# Altium PCB IoT_SYNTHPATCH_ANALOG.PcbDoc (part 1 of 2)
Units mm, origin at the board's own origin, x right, y up, seen from the top; angles counter-clockwise.
Board outline 109 x 54 mm, 4 copper layers (Top Layer, PWR, GND, Bottom Layer), stack 1.587 mm thick; 165 components, 141 nets, 542 pads, 344 vias.
Unrouted connection lines stored in the file: 4.
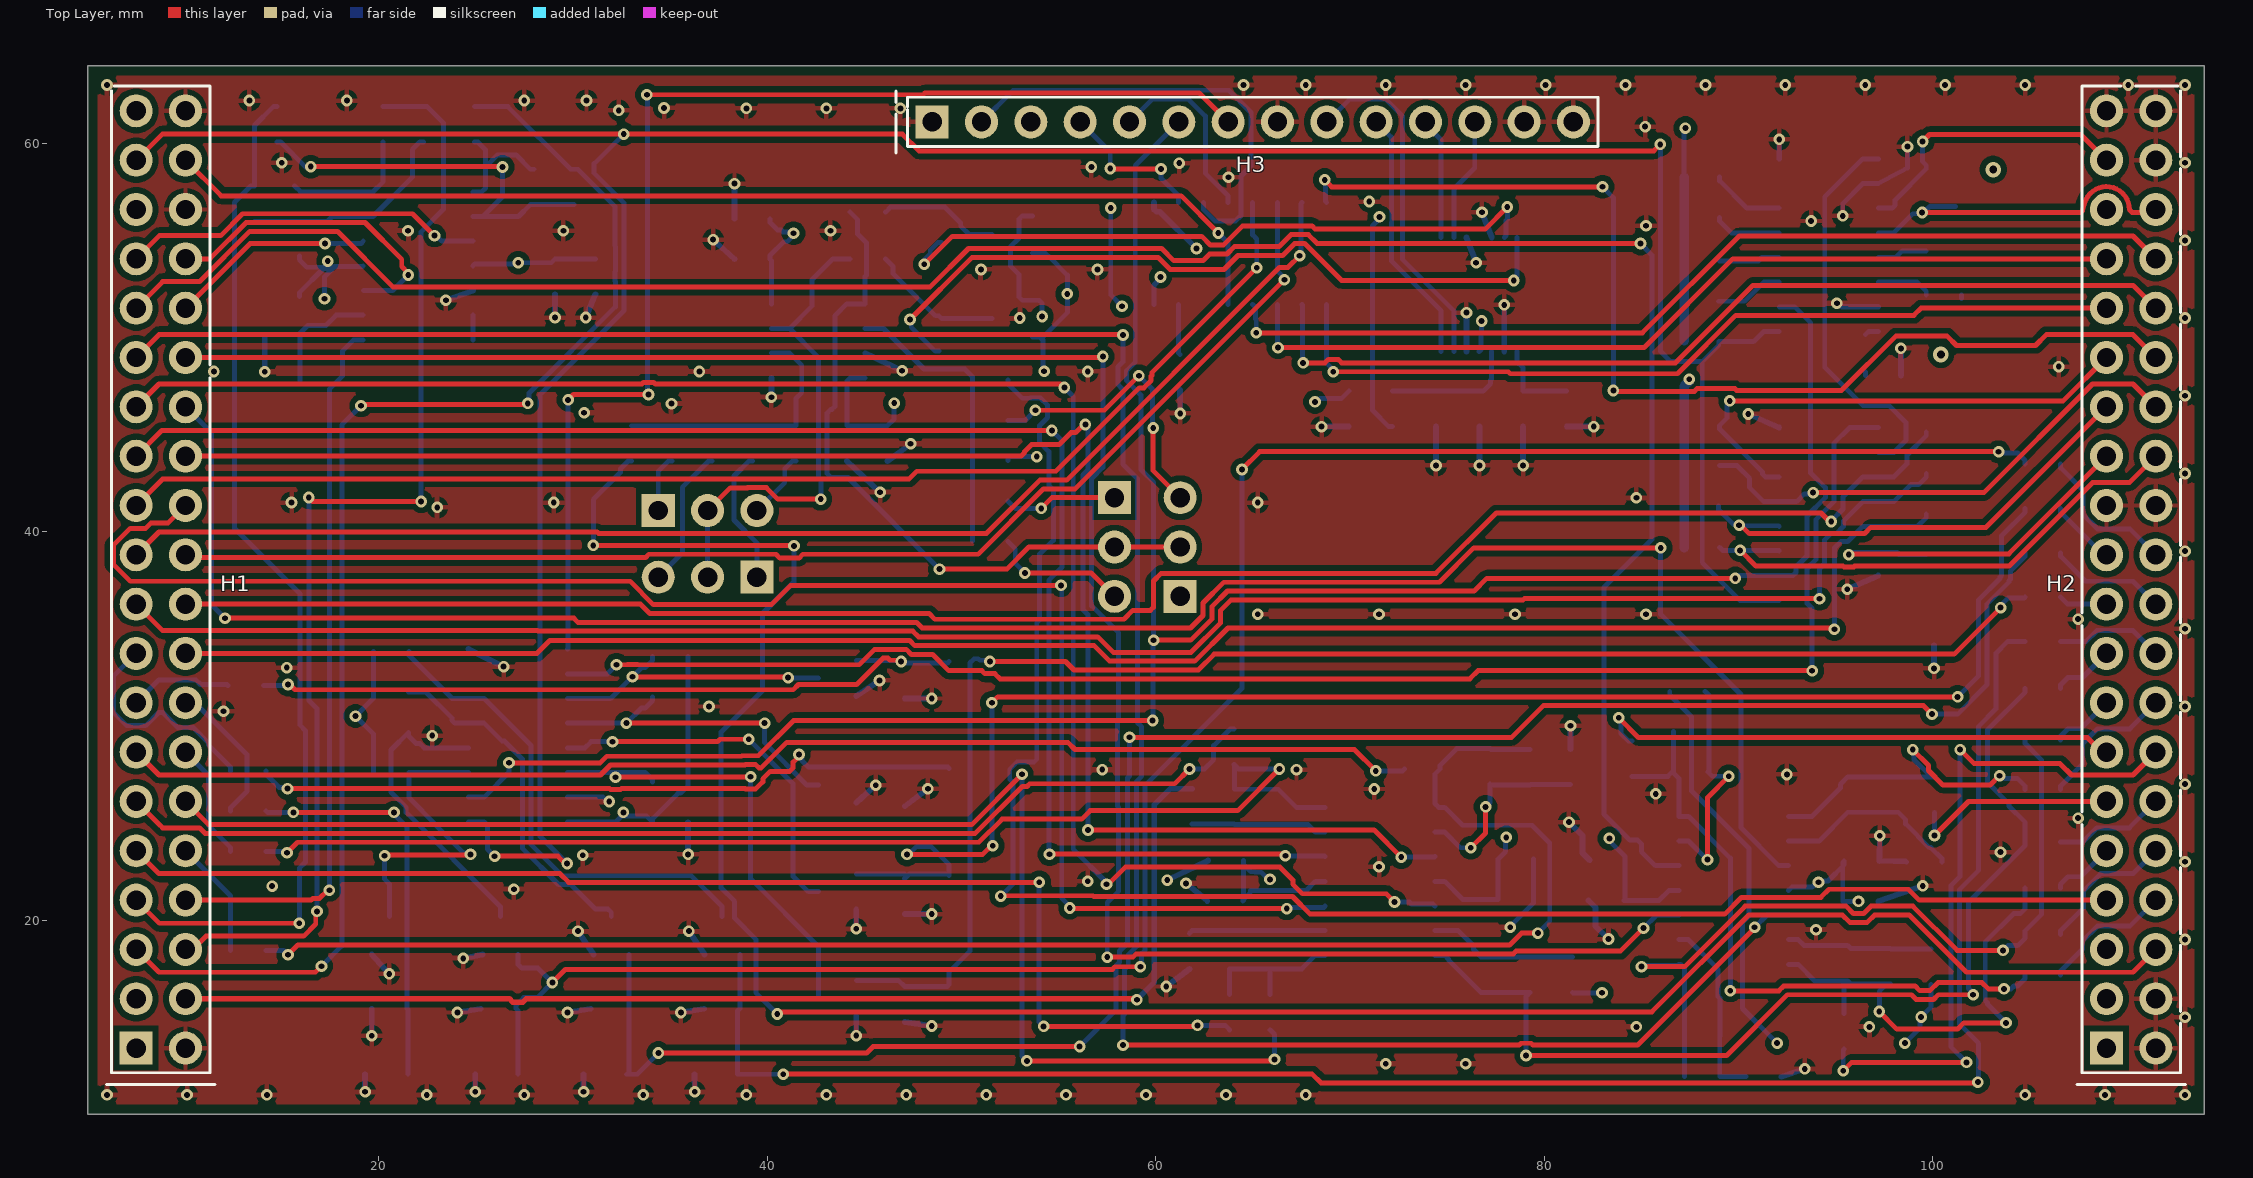
[diagram p0: Top Layer view]
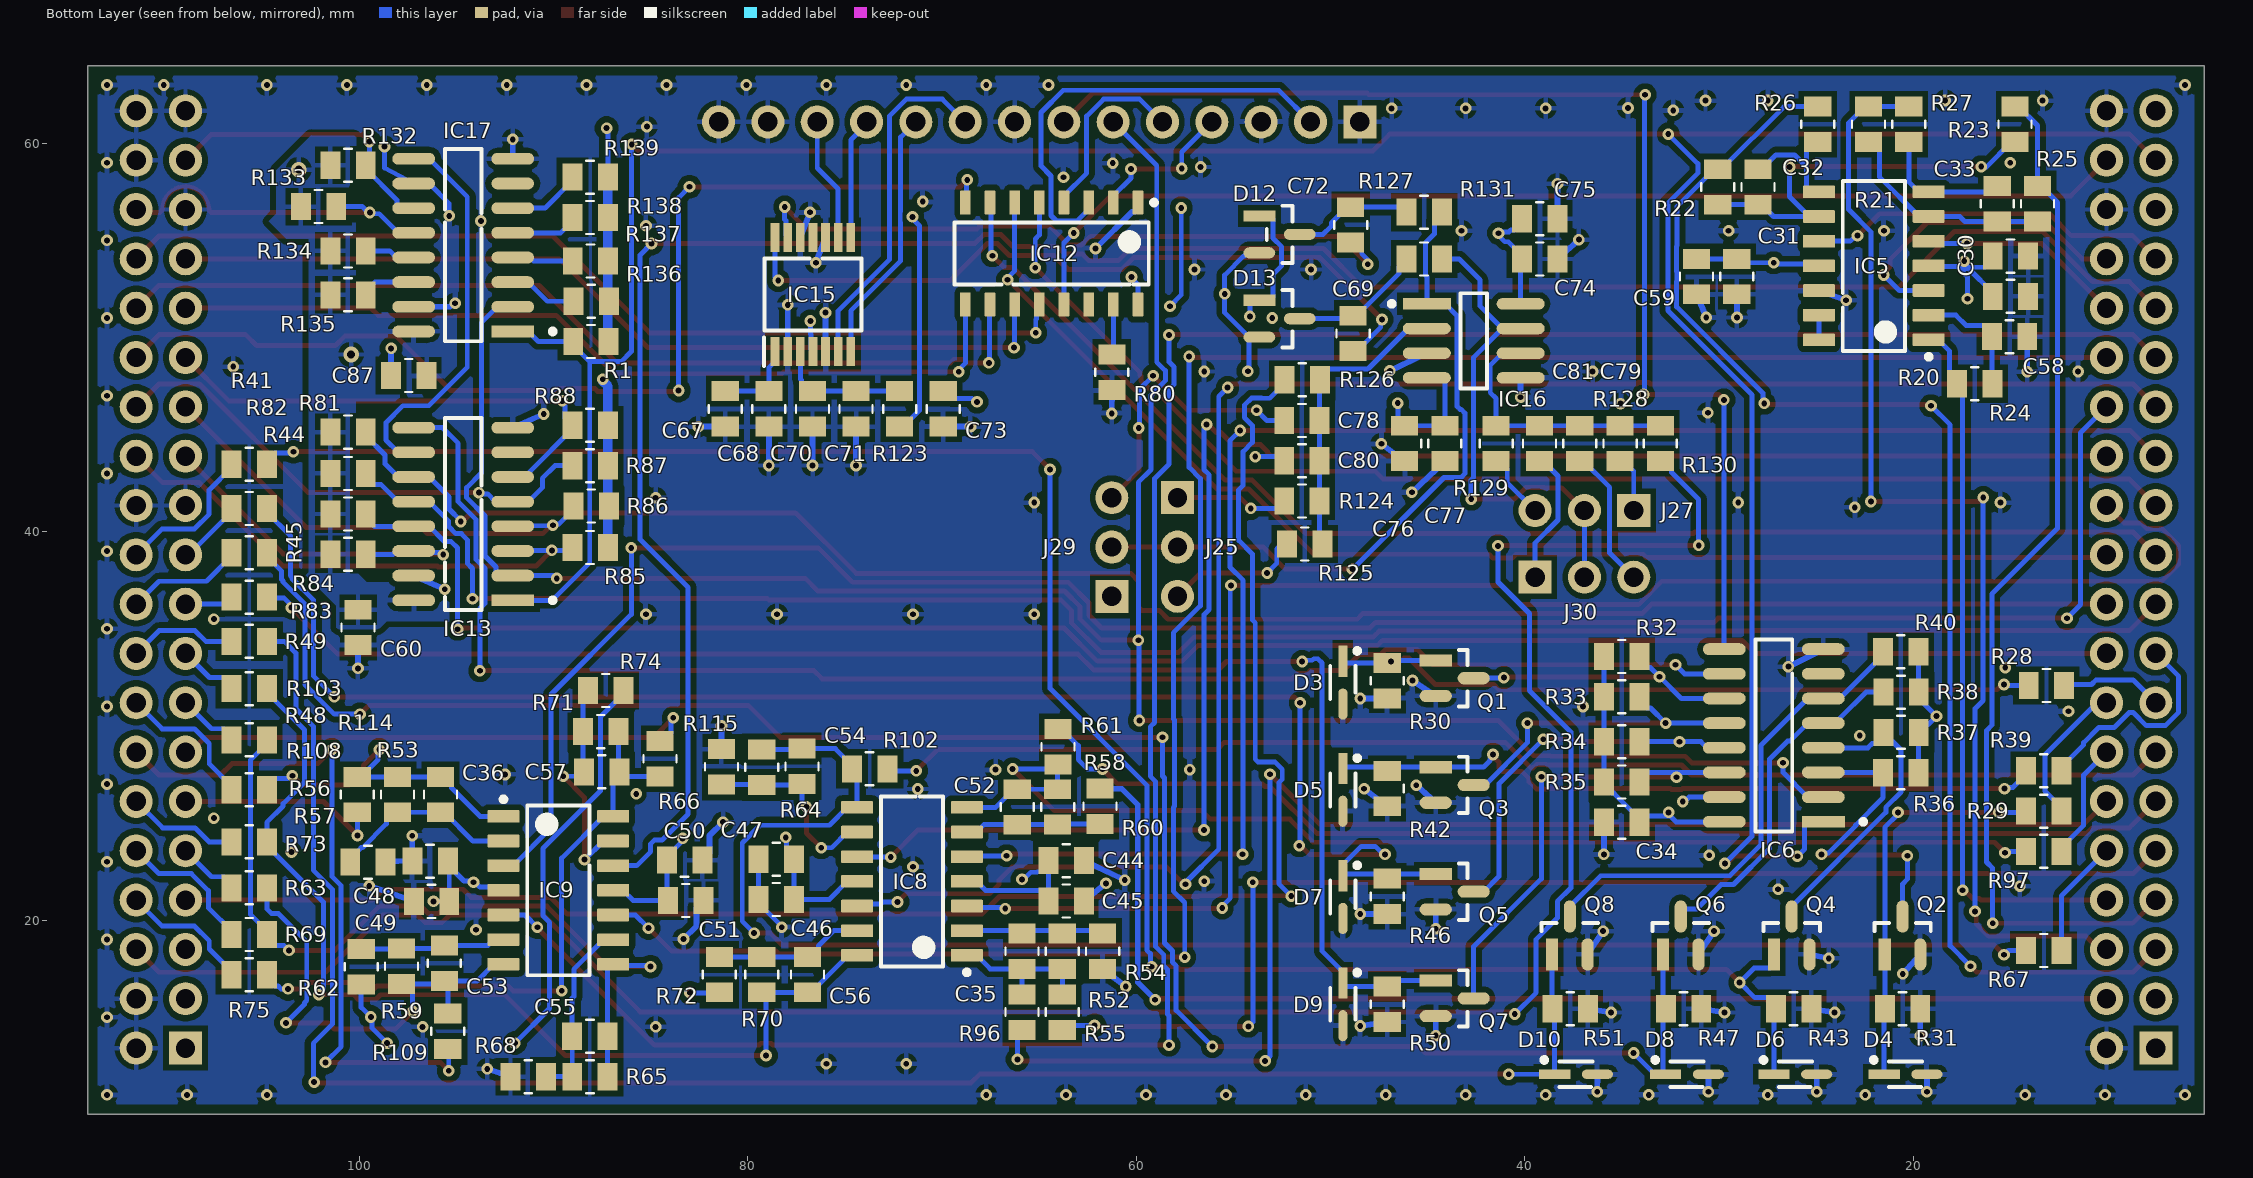
[diagram p1: Bottom Layer view, seen from below]
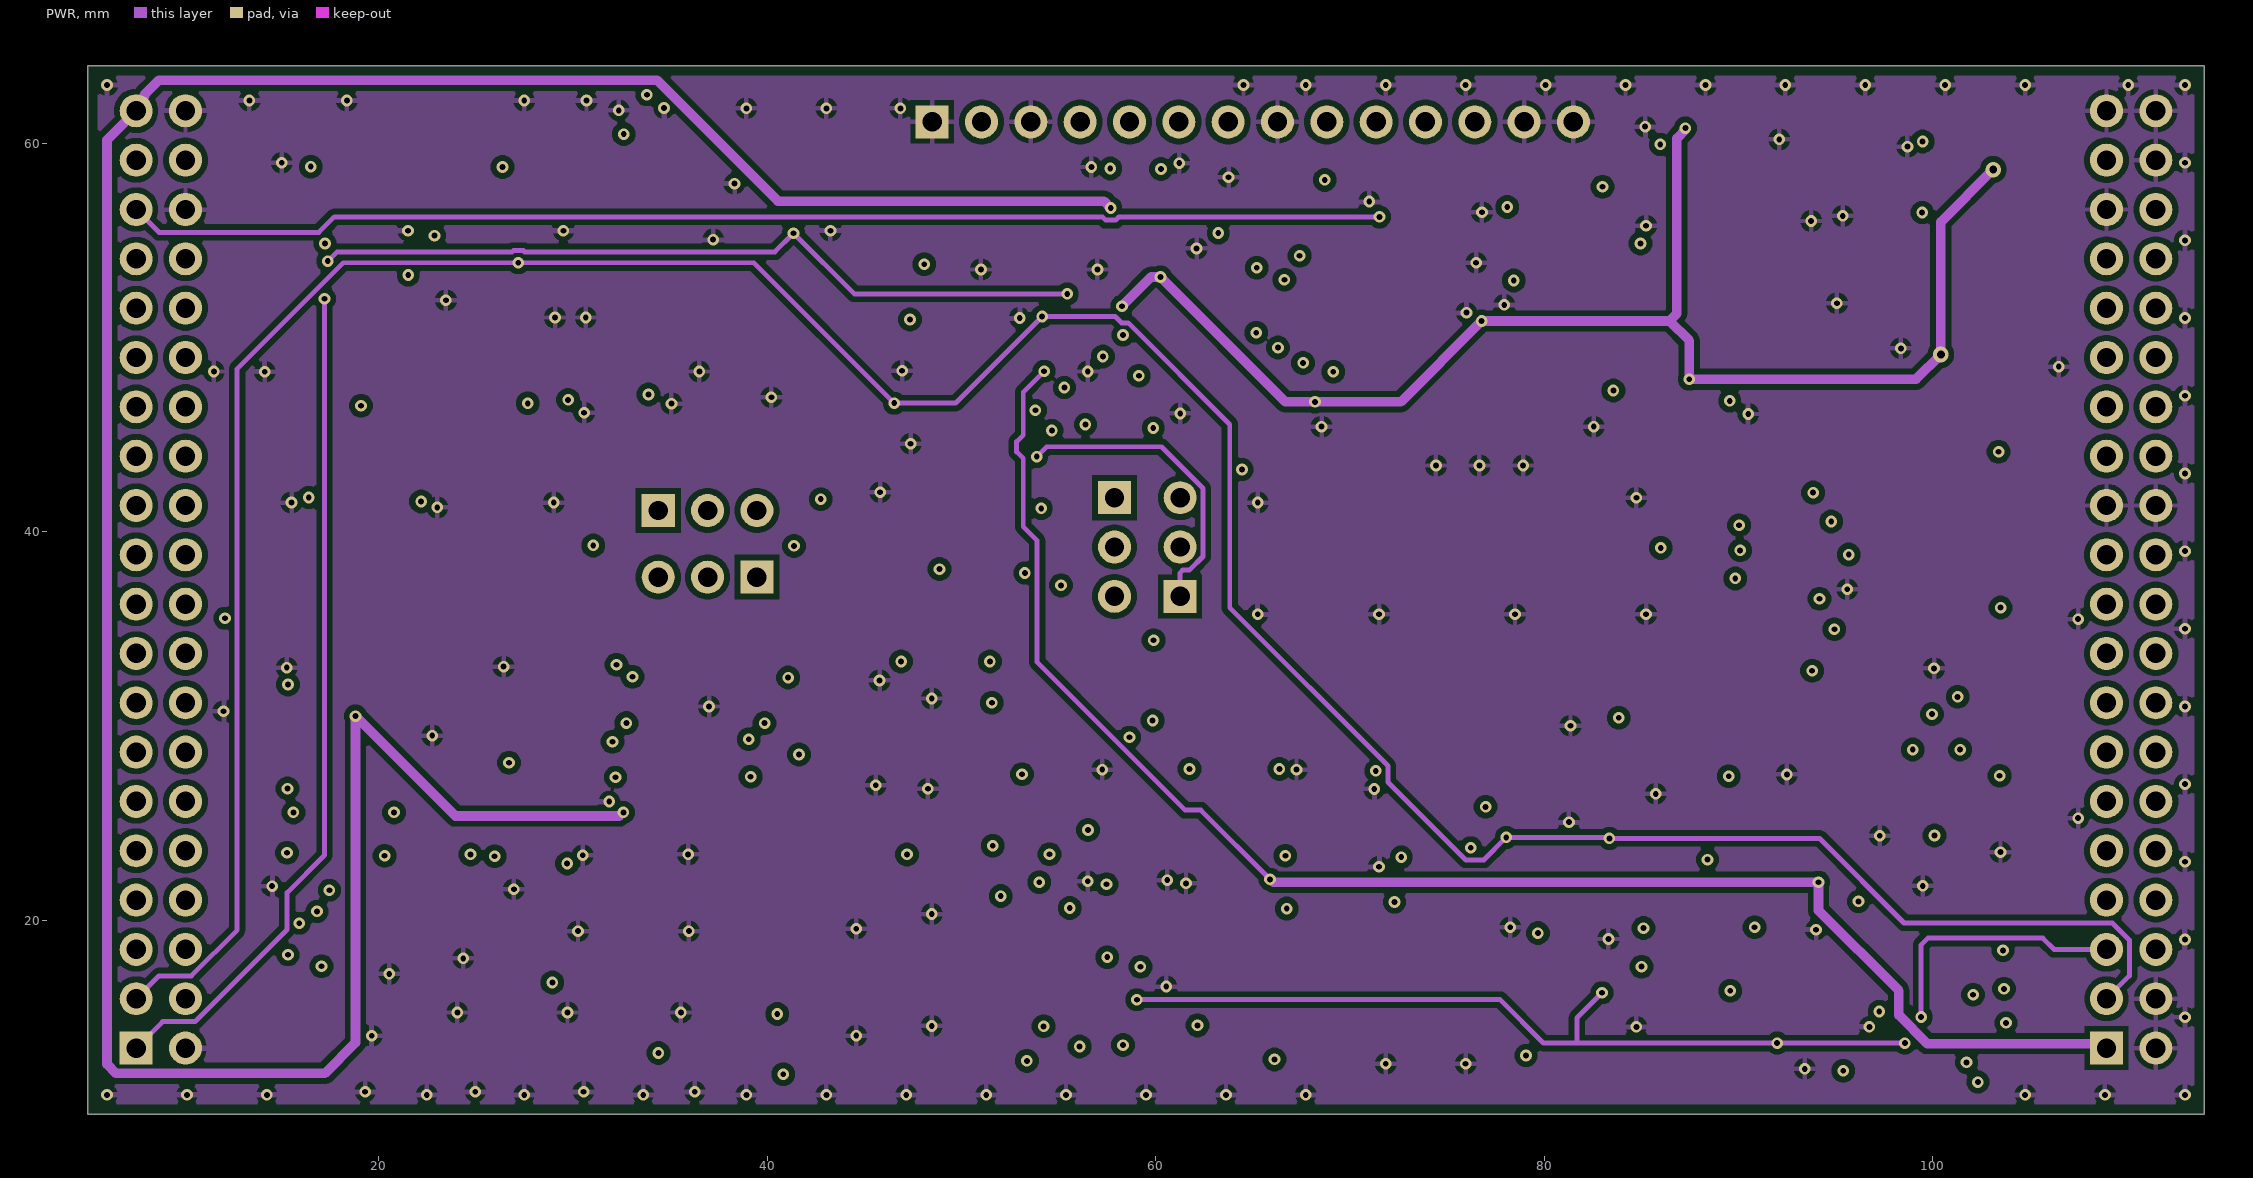
[diagram p2: PWR]
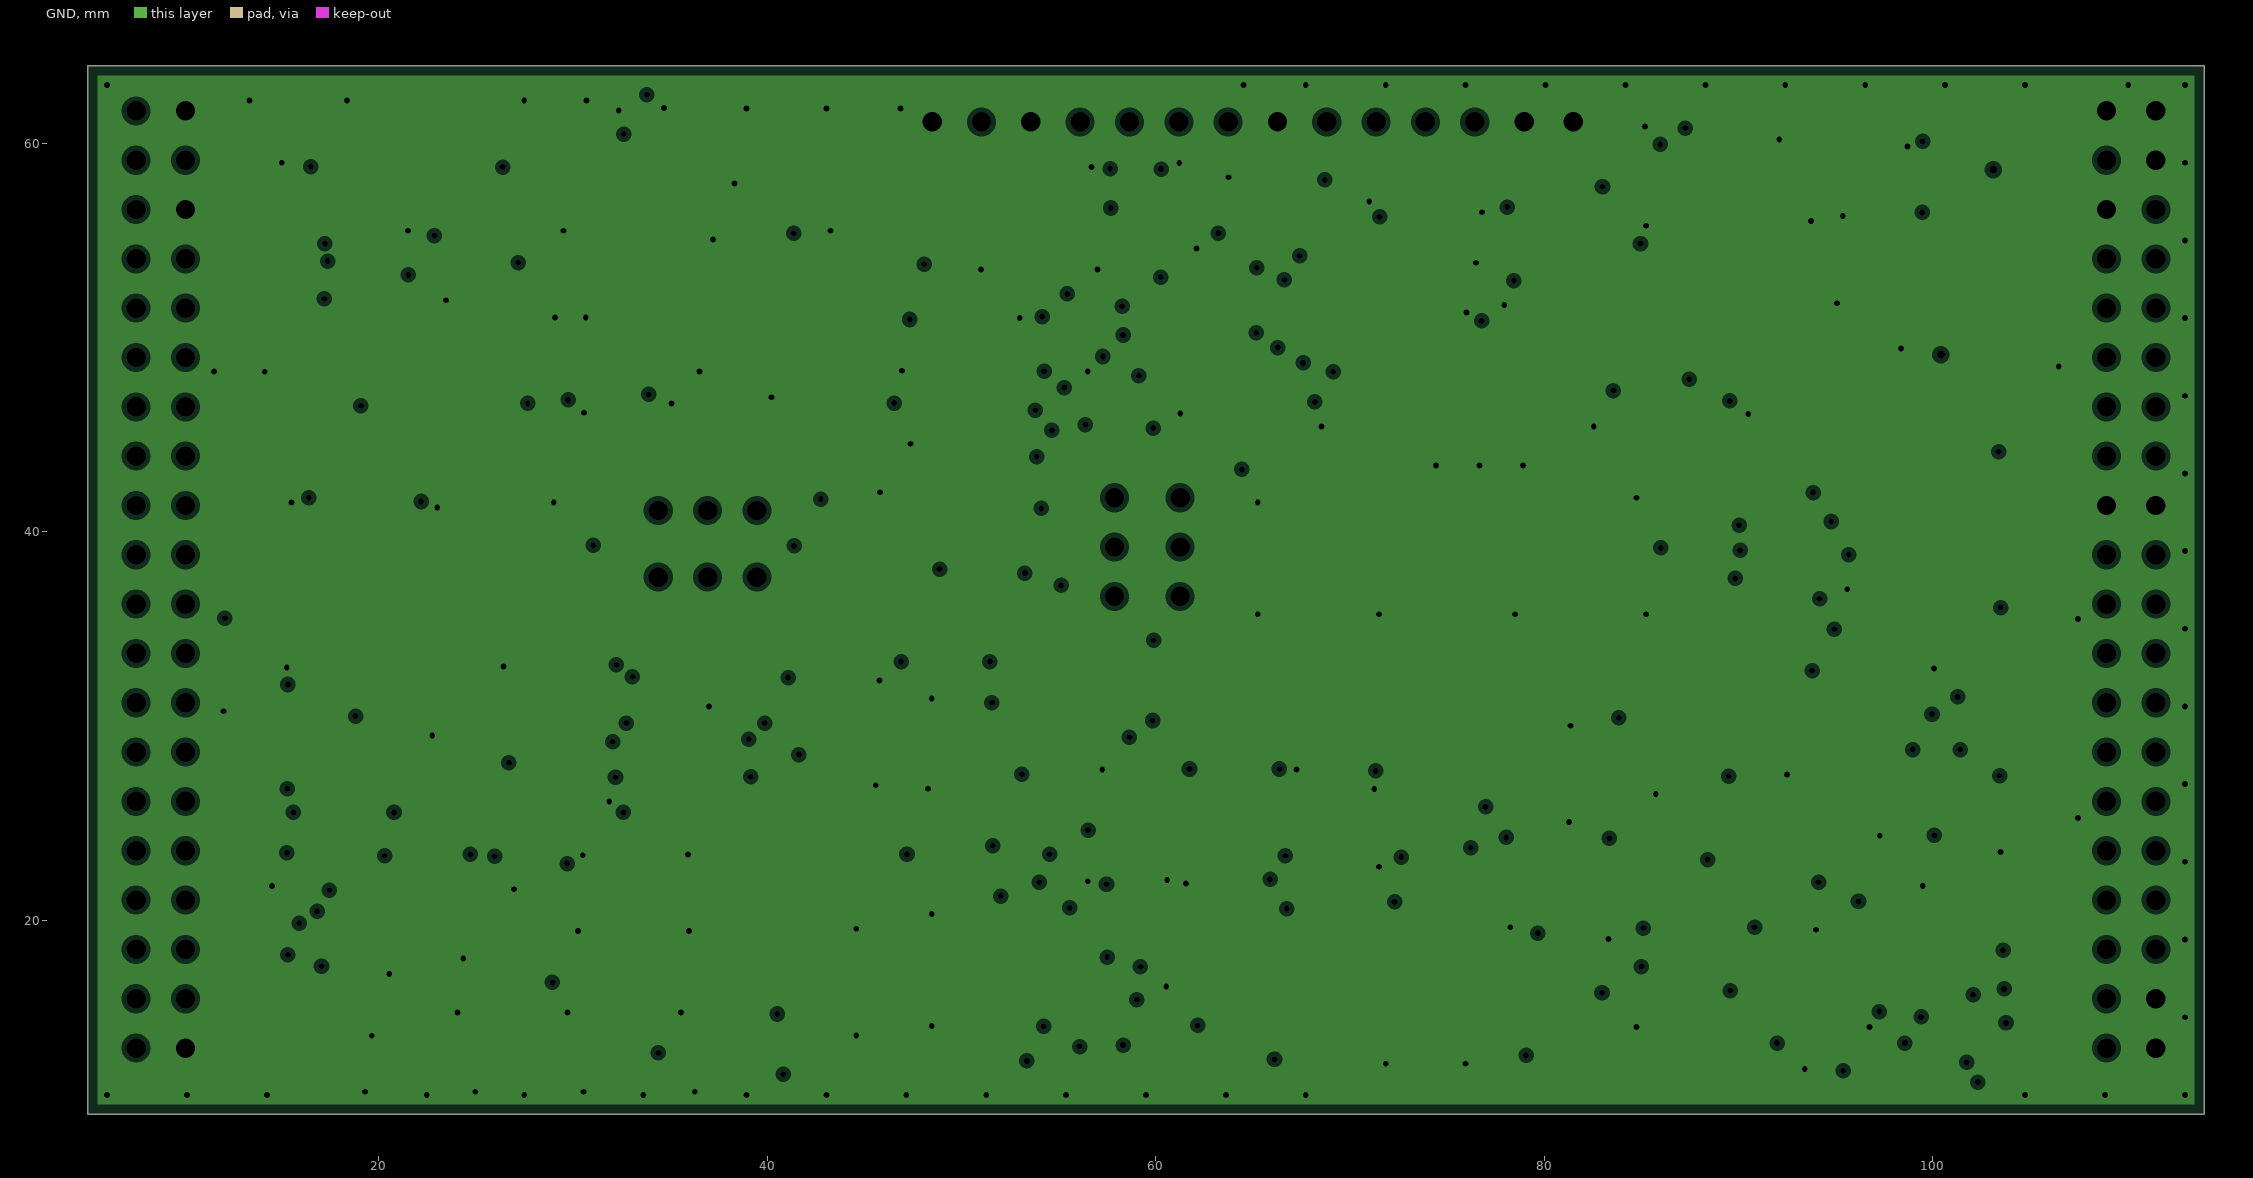
[diagram p3: GND, clearances drawn from the general rule]

## Layer stack, top to bottom
Top Solder: solder mask 0.0102, Solder Resist, Dk 3.5
Top Layer: signal copper 0.0356
Dielectric 2: prepreg 0.2104, PP-006, Dk 4.4
PWR: signal copper 0.0152
Dielectric 1: dielectric 1.065, FR-4, Dk 4.6
GND: plane copper 0.0152, net GND
Dielectric 3: prepreg 0.2104, PP-006, Dk 4.4
Bottom Layer: signal copper 0.0356
Bottom Solder: solder mask 0.0102, Solder Resist, Dk 3.5

## Board outline
5,10 5,64 114,64 114,10

## Design rules (kind name [scope] priority, off if disabled: settings)
BoardOutlineClearance [All] p1: gap=0.5 ignorepadtopadclearanceinfootprint=FALSE
Clearance Clearance_Polygon [InPolygon] p1: gap=0.3 ignorepadtopadclearanceinfootprint=FALSE
Clearance [All] p2: gap=0.2 ignorepadtopadclearanceinfootprint=FALSE
DiffPairsRouting [All] p1: maxlimit=0.2 minlimit=0.16 mostfreqgap=0.18 toplayer_minwidth=0.28 toplayer_maxwidth=0.32 toplayer_prefwidth=0.3 midlayer1_minwidth=0.28 midlayer1_maxwidth=0.32 midlayer1_prefwidth=0.3 bottomlayer_minwidth=0.28 bottomlayer_maxwidth=0.32 bottomlayer_prefwidth=0.3 maxuncoupledlength=12.7
HoleToHoleClearance [All] p1: gap=0.5 allowstackedmicrovias=TRUE
MinimumSolderMaskSliver [All] p1: minsoldermaskwidth=0.1
PlaneClearance [All] p1: clearance=0.25
PlaneConnect PlaneConnect_Vias [IsVia] p1: planeconnectstyle=Direct reliefexpansion=0.508 reliefentries=4 reliefconductorwidth=0.254 reliefairgap=0.254 // Stitching vias direct to plane
PlaneConnect [All] p2: planeconnectstyle=Relief reliefexpansion=0.508 reliefentries=4 reliefconductorwidth=0.254 reliefairgap=0.254
PolygonConnect [All] p1: connectstyle=Relief reliefconductorwidth=0.254 reliefentries=4 polygonreliefangle="90 Angle" airgapwidth=0.254
RoutingVias [All] p1: holewidth=0.3 width=0.6 viastyle="Through Hole" minholewidth=0.3 minwidth=0.6 maxholewidth=0.711 maxwidth=1.27
SilkToSolderMaskClearance [IsPad] p1: minsilkscreentomaskgap=0.15 clearancetoexposedcopper=TRUE
SolderMaskExpansion [All] p1: expansion=0 istentingtop=FALSE
SupplyNets "Schematic Supply Nets_5" [InNet('+3.3')] p1: voltage=0.000
SupplyNets "Schematic Supply Nets_4" [InNet('GND')] p2: voltage=0.000
SupplyNets "Schematic Supply Nets_3" [InNet('+5')] p3: voltage=0.000
SupplyNets "Schematic Supply Nets_2" [InNet('-12')] p4: voltage=0.000
SupplyNets "Schematic Supply Nets_1" [InNet('VREF_5')] p5: voltage=0.000
SupplyNets "Schematic Supply Nets" [InNet('+12')] p6: voltage=0.000
Width Width_PWR_LV [InNetClass('PWR_LV')] p1: maxlimit=2 minlimit=0.3 preferedwidth=0.5
Width Width_PWR_IN [InNetClass('PWR_IN')] p2: maxlimit=2 minlimit=0.4 preferedwidth=0.8
Width [All] p3: maxlimit=2 minlimit=0.15 preferedwidth=0.254
24 further rules are at their usual default settings.

## Classes and differential pairs
component class ADC_A: C67 C68 C69 C70 C71 C72 C73 D12 D13 IC15 R123
component class MUTE_BUTTONS_A: C60 IC12 IC13 R1 R80 R81 R82 R83 R84 R85 R86 R87 R88
component class MENU_BUTTONS_A: C87 IC17 R132 R133 R134 R135 R136 R137 R138 R139
component class INPUTS_GATES_A: C34 D3 D4 D5 D6 D7 D8 D9 D10 IC6 Q1 Q2 Q3 Q4 Q5 Q6 Q7 Q8 R28 R29 R30 R31 R32 R33 R34 R35 R36 R37 R38 R39 R40 R41 R42 R43 R44 R45 R46 R47 R48 R49 R50 R51
component class CONNECTORS: H1 H2 H3
component class VOCT_AMPS: C30 C31 C32 C33 C58 C59 IC5 R20 R21 R22 R23 R24 R25 R26 R27
component class LFO_AMPS: C35 C36 C44 C45 C46 C47 C48 C49 C50 C51 C52 C53 C54 C55 C56 C57 IC8 IC9 R52 R53 R54 R55 R56 R57 R58 R59 R60 R61 R62 R63 R64 R65 R66 R67 R68 R69 R70 R71 R72 R73 R74 R75 R96 R97 R102 R103 R108 R109 R114 R115
component class ADC_AMPS: C74 C75 C76 C77 C78 C79 C80 C81 IC16 J25 J27 J29 J30 R124 R125 R126 R127 R128 R129 R130 R131

## Components (designator, comment, footprint, x,y, rotation, side; value= is the part's Value field where it differs from the comment)
C30 "0.1uF" CAPC2013X145X48NL20T23 14.987,54.192 r0 bottom
C31 "0.1uF" CAPC2013X145X48NL20T23 29.075,53.138 r90 bottom
C32 "100pF" CAPC2013X145X48NL20T23 27.983,57.75 r270 bottom
C33 "100pF" CAPC2013X145X48NL20T23 15.664,56.888 r270 bottom
C34 "0.1uF" CAPC2013X145X48NL20T23 35.009,25.038 r0 bottom
C35 "100pF" CAPC2013X145X48NL20T23 65.884,18.398 r90 bottom
C36 "100pF" CAPC2013X145X48NL20T23 95.832,26.464 r270 bottom
C44 "10uF" CAPC2013X145X48NL20T23 63.599,23.061 r180 bottom
C45 "0.1uF" CAPC2013X145X48NL20T23 63.602,20.987 r180 bottom
C46 "0.1uF" CAPC2013X145X48NL20T23 78.537,21.063 r0 bottom
C47 "10uF" CAPC2013X145X48NL20T23 78.537,23.137 r0 bottom
C48 "10uF" CAPC2013X145X48NL20T23 96.365,23.035 r0 bottom
C49 "0.1uF" CAPC2013X145X48NL20T23 96.29,20.961 r0 bottom
C50 "0.1uF" CAPC2013X145X48NL20T23 83.259,23.086 r180 bottom
C51 "10uF" CAPC2013X145X48NL20T23 83.197,21.012 r180 bottom
C52 "100pF" CAPC2013X145X48NL20T23 66.125,25.824 r270 bottom
C53 "100pF" CAPC2013X145X48NL20T23 95.629,17.778 r90 bottom
C54 "100pF" CAPC2013X145X48NL20T23 77.214,27.913 r270 bottom
C55 "100pF" CAPC2013X145X48NL20T23 88.136,14.018 r0 bottom
C56 "100pF" CAPC2013X145X48NL20T23 76.934,17.195 r90 bottom
C57 "100pF" CAPC2013X145X48NL20T23 87.518,27.633 r0 bottom
C58 "10uF" CAPC2013X145X48NL20T23 14.987,52.118 r0 bottom
C59 "10uF" CAPC2013X145X48NL20T23 31.149,53.138 r90 bottom
C60 "0.1uF" CAPC2013X145X48NL20T23 100.075,35.068 r270 bottom
C67 "0.1uF" CAPC2013X145X48NL20T23 81.162,46.322 r90 bottom
C68 "10uF" CAPC2013X145X48NL20T23 78.918,46.322 r90 bottom
C69 "1uF" CAPC2013X145X48NL20T23 48.837,50.208 r270 bottom
C70 "0.1uF" CAPC2013X145X48NL20T23 76.675,46.322 r90 bottom
C71 "10uF" CAPC2013X145X48NL20T23 74.431,46.322 r90 bottom
C72 "1uF" CAPC2013X145X48NL20T23 48.964,55.796 r270 bottom
C73 "0.1uF" CAPC2013X145X48NL20T23 69.944,46.322 r90 bottom
C74 "0.1uF" CAPC2013X145X48NL20T23 39.224,54.041 r180 bottom
C75 "10uF" CAPC2013X145X48NL20T23 39.224,56.115 r180 bottom
C76 "0.1uF" CAPC2013X145X48NL20T23 46.184,44.544 r270 bottom
C77 "10uF" CAPC2013X145X48NL20T23 44.11,44.544 r270 bottom
C78 "270pF" CAPC2013X145X48NL20T23 51.471,45.729 r0 bottom
C79 "270pF" CAPC2013X145X48NL20T23 37.161,44.544 r270 bottom
C80 "68pF" CAPC2013X145X48NL20T23 51.471,43.655 r0 bottom
C81 "68pF" CAPC2013X145X48NL20T23 39.235,44.544 r270 bottom
C87 "0.1uF" CAPC2013X145X48NL20T23 97.457,48.041 r0 bottom
D3 "1N4148WS" 4148 49.363,32.226 r270 bottom
D4 "1N4148WS" 4148 20.389,12.061 r180 bottom
D5 "1N4148WS" 4148 49.363,26.705 r270 bottom
D6 "1N4148WS" 4148 26.064,12.061 r180 bottom
D7 "1N4148WS" 4148 49.363,21.184 r270 bottom
D8 "1N4148WS" 4148 31.641,12.061 r180 bottom
D9 "1N4148WS" 4148 49.363,15.664 r270 bottom
D10 "1N4148WS" 4148 37.356,12.061 r180 bottom
D12 "BAT54S-E3-08" FP-6_541-5014_01-4-IPC_A 52.622,55.311 r180 bottom value=10pF
D13 "BAT54S-E3-08" FP-6_541-5014_01-4-IPC_A 52.622,50.967 r180 bottom value=10pF
H1 "Pin header 2x20 2.54 mm" HDR_2x20_P2.54 8.77,37.54 r90 top
H2 "Pin header 2x20 2.54 mm" HDR_2x20_P2.54 110.23,37.54 r90 top
H3 "Pin header 1x14 2.54 mm" HDR_1X14_P2.54 65,61.087 r0 top
IC5 "TL074CDRG4" TL074 22.02,53.688 r0 bottom
IC6 "74HC165D,653" FP-SOT109-1-MFG 27.17,29.507 r0 bottom
IC8 "TL074CDRG4" TL074 71.55,21.994 r0 bottom
IC9 "TL074CDRG4" TL074 89.761,21.534 r180 bottom
IC12 "TLC5916QDRQ1" D0016A_N 64.356,54.323 r270 bottom
IC13 "74HC165D,653" FP-SOT109-1-MFG 94.658,40.912 r0 bottom
IC15 "PCM1808PW" SOP65P640X120-14N 76.65,52.215 r90 bottom
IC16 "TL072ACDRE4" TL072 42.624,49.827 r180 bottom
IC17 "74HC165D,653" FP-SOT109-1-MFG 94.658,54.755 r0 bottom
J25 "Pinheader_1x3" HDR_1X3_P2.54 57.879,41.75 r270 bottom
J27 "Pinheader_1x3" HDR_1X3_P2.54 34.384,41.09 r0 bottom
J29 "Pinheader_1x3" HDR_1X3_P2.54 61.257,36.67 r90 bottom
J30 "Pinheader_1x3" HDR_1X3_P2.54 39.464,37.661 r180 bottom
Q1 "MMBT3904-7-F" 3904-SOT23 43.604,32.454 r180 bottom
Q2 "MMBT3904-7-F" 3904-SOT23 20.542,19.206 r90 bottom
Q3 "MMBT3904-7-F" 3904-SOT23 43.604,26.959 r180 bottom
Q4 "MMBT3904-7-F" 3904-SOT23 26.253,19.206 r90 bottom
Q5 "MMBT3904-7-F" 3904-SOT23 43.604,21.464 r180 bottom
Q6 "MMBT3904-7-F" 3904-SOT23 31.963,19.206 r90 bottom
Q7 "MMBT3904-7-F" 3904-SOT23 43.604,15.969 r180 bottom
Q8 "MMBT3904-7-F" 3904-SOT23 37.674,19.206 r90 bottom
R1 "10K" FP-RN73R2A-IPC_A 88.08,49.794 r180 bottom
R20 "20K" FP-RN73R2A-IPC_A 15.032,50.044 r0 bottom
R21 "20K" FP-RN73R2A-IPC_A 22.294,60.978 r270 bottom
R22 "20K" FP-RN73R2A-IPC_A 30.057,57.75 r270 bottom
R23 "20K" FP-RN73R2A-IPC_A 14.75,60.978 r270 bottom
R24 "20K" FP-RN73R2A-IPC_A 16.819,47.622 r180 bottom
R25 "20K" FP-RN73R2A-IPC_A 13.59,56.888 r90 bottom
R26 "1K" FP-RN73R2A-IPC_A 24.91,60.978 r270 bottom
R27 "1K" FP-RN73R2A-IPC_A 20.22,60.978 r270 bottom
R28 "10K" FP-RN73R2A-IPC_A 13.132,32.08 r0 bottom
R29 "10K" FP-RN73R2A-IPC_A 13.279,25.612 r0 bottom
R30 "100K" FP-RN73R2A-IPC_A 47.074,32.327 r90 bottom
R31 "100K" FP-RN73R2A-IPC_A 20.542,15.436 r0 bottom
R32 "10K" FP-RN73R2A-IPC_A 35.009,33.571 r180 bottom
R33 "10K" FP-RN73R2A-IPC_A 35.009,31.497 r180 bottom
R34 "10K" FP-RN73R2A-IPC_A 35.009,29.186 r180 bottom
R35 "10K" FP-RN73R2A-IPC_A 35.009,27.112 r180 bottom
R36 "10K" FP-RN73R2A-IPC_A 20.638,27.591 r0 bottom
R37 "10K" FP-RN73R2A-IPC_A 20.621,29.665 r0 bottom
R38 "10K" FP-RN73R2A-IPC_A 20.621,31.739 r0 bottom
R39 "10K" FP-RN73R2A-IPC_A 13.279,27.686 r0 bottom
R40 "10K" FP-RN73R2A-IPC_A 20.638,33.82 r0 bottom
R41 "10K" FP-RN73R2A-IPC_A 105.684,43.477 r180 bottom
R42 "100K" FP-RN73R2A-IPC_A 47.074,26.773 r90 bottom
R43 "100K" FP-RN73R2A-IPC_A 26.153,15.436 r0 bottom
R44 "10K" FP-RN73R2A-IPC_A 105.684,41.196 r180 bottom
R45 "10K" FP-RN73R2A-IPC_A 105.684,38.914 r180 bottom
R46 "100K" FP-RN73R2A-IPC_A 47.074,21.22 r90 bottom
R47 "100K" FP-RN73R2A-IPC_A 31.819,15.436 r0 bottom
R48 "10K" FP-RN73R2A-IPC_A 105.684,36.632 r180 bottom
R49 "10K" FP-RN73R2A-IPC_A 105.682,34.351 r180 bottom
R50 "100K" FP-RN73R2A-IPC_A 47.074,15.666 r90 bottom
R51 "100K" FP-RN73R2A-IPC_A 37.661,15.436 r0 bottom
R52 "20K" FP-RN73R2A-IPC_A 63.81,18.398 r270 bottom
R53 "20K" FP-RN73R2A-IPC_A 98.042,26.464 r90 bottom
R54 "20K" FP-RN73R2A-IPC_A 61.736,18.398 r90 bottom
R55 "1K" FP-RN73R2A-IPC_A 63.81,15.263 r270 bottom
R56 "20K" FP-RN73R2A-IPC_A 99.566,22.985 r0 bottom
R57 "1K" FP-RN73R2A-IPC_A 100.116,26.464 r270 bottom
R58 "20K" FP-RN73R2A-IPC_A 64.051,25.826 r90 bottom
R59 "20K" FP-RN73R2A-IPC_A 97.839,17.625 r270 bottom
R60 "20K" FP-RN73R2A-IPC_A 61.872,25.855 r270 bottom
R61 "1K" FP-RN73R2A-IPC_A 64.03,28.93 r90 bottom
R62 "20K" FP-RN73R2A-IPC_A 99.913,17.6 r90 bottom
R63 "1K" FP-RN73R2A-IPC_A 105.682,21.659 r0 bottom
R64 "20K" FP-RN73R2A-IPC_A 79.288,27.876 r90 bottom
R65 "20K" FP-RN73R2A-IPC_A 88.134,11.936 r180 bottom
R66 "20K" FP-RN73R2A-IPC_A 81.362,27.896 r270 bottom
R67 "1K" FP-RN73R2A-IPC_A 13.279,18.433 r180 bottom
R68 "20K" FP-RN73R2A-IPC_A 91.311,11.936 r180 bottom
R69 "1K" FP-RN73R2A-IPC_A 105.682,19.255 r0 bottom
R70 "20K" FP-RN73R2A-IPC_A 79.288,17.195 r270 bottom
R71 "20K" FP-RN73R2A-IPC_A 87.572,29.707 r180 bottom
R72 "20K" FP-RN73R2A-IPC_A 81.468,17.195 r90 bottom
R73 "1K" FP-RN73R2A-IPC_A 105.682,24.026 r0 bottom
R74 "20K" FP-RN73R2A-IPC_A 87.323,31.826 r0 bottom
R75 "1K" FP-RN73R2A-IPC_A 105.682,17.181 r0 bottom
R80 "2K" FP-RN73R2A-IPC_A 61.257,48.204 r90 bottom
R81 "10K" FP-RN73R2A-IPC_A 100.59,45.129 r180 bottom
R82 "10K" FP-RN73R2A-IPC_A 100.59,42.999 r180 bottom
R83 "10K" FP-RN73R2A-IPC_A 100.59,40.912 r180 bottom
R84 "10K" FP-RN73R2A-IPC_A 100.59,38.837 r180 bottom
R85 "10K" FP-RN73R2A-IPC_A 88.126,39.186 r0 bottom
R86 "10K" FP-RN73R2A-IPC_A 88.072,41.324 r0 bottom
R87 "10K" FP-RN73R2A-IPC_A 88.126,43.398 r0 bottom
R88 "10K" FP-RN73R2A-IPC_A 88.126,45.479 r0 bottom
R96 "100K" FP-RN73R2A-IPC_A 65.884,15.263 r90 bottom
R97 "100K" FP-RN73R2A-IPC_A 13.279,23.538 r0 bottom
R102 "100K" FP-RN73R2A-IPC_A 73.734,27.785 r0 bottom
R103 "100K" FP-RN73R2A-IPC_A 105.682,31.92 r180 bottom
R108 "100K" FP-RN73R2A-IPC_A 105.682,26.713 r180 bottom
R109 "100K" FP-RN73R2A-IPC_A 95.451,14.272 r90 bottom
R114 "100K" FP-RN73R2A-IPC_A 105.682,29.279 r180 bottom
R115 "100K" FP-RN73R2A-IPC_A 84.524,28.313 r270 bottom
R123 "10R" FP-RN73R2A-IPC_A 72.188,46.322 r270 bottom
R124 "27K" FP-RN73R2A-IPC_A 51.471,41.581 r0 bottom
R125 "100K" FP-RN73R2A-IPC_A 51.332,39.37 r0 bottom
R126 "100K" FP-RN73R2A-IPC_A 51.459,47.828 r180 bottom
R127 "470" FP-RN73R2A-IPC_A 45.181,56.457 r0 bottom
R128 "27K" FP-RN73R2A-IPC_A 35.087,44.544 r270 bottom
R129 "100K" FP-RN73R2A-IPC_A 41.471,44.544 r270 bottom
R130 "100K" FP-RN73R2A-IPC_A 33.013,44.544 r90 bottom
R131 "470" FP-RN73R2A-IPC_A 45.181,54.041 r0 bottom
R132 "10K" FP-RN73R2A-IPC_A 100.59,58.869 r180 bottom
R133 "10K" FP-RN73R2A-IPC_A 102.108,56.744 r180 bottom
R134 "10K" FP-RN73R2A-IPC_A 100.59,54.458 r180 bottom
R135 "10K" FP-RN73R2A-IPC_A 100.59,52.193 r180 bottom
R136 "10K" FP-RN73R2A-IPC_A 88.072,51.868 r0 bottom
R137 "10K" FP-RN73R2A-IPC_A 88.107,53.942 r0 bottom
R138 "10K" FP-RN73R2A-IPC_A 88.126,56.177 r0 bottom
R139 "10K" FP-RN73R2A-IPC_A 88.126,58.257 r0 bottom

## Footprints (in the part's own frame and the unit in brackets; to place one, negate y for a bottom-side part, rotate by r counter-clockwise, add the part's x,y. Pads: shape width x height; smd on the part's side, far side on the other; paste and mask are expansions set on the pad)
3904-SOT23 [mm]
  rect 1.659x0.627 smd paste+0 mask+0: 1(-0.977,0.915)
  rrect100% 1.659x0.627 smd paste+0 mask+0: 2(-0.977,-0.915) 3(0.977,0)
  silkscreen extent 0.23,-1.45 0.65,1.45, body extent -1.2,-1.45 1.2,1.45, height 1.1
4148 [mm]
  rect 1.606x0.472 smd paste+0 mask+0: 1(-1.1,0)
  rrect100% 1.606x0.472 smd paste+0 mask+0: 2(1.1,0)
  silkscreen extent -1.76,-0.65 0.85,0.86, body extent -1.25,-0.63 1.25,0.63, height 0.9
CAPC2013X145X48NL20T23 [mm] "0805 (2012 metric)"
  rect 1.025x1.4 smd paste+0 mask+0: 1(-0.913,0) 2(0.913,0)
  silkscreen extent -0.19,-0.85 0.19,0.85
D0016A_N [mm] "SOIC, 16-Leads, Body 10x4mm, Pitch 1.27mm, IPC High Density"
  rrect18% 1.25x0.55 smd: 1(-2.625,4.445) 2(-2.625,3.175) 3(-2.625,1.905) 4(-2.625,0.635) 5(-2.625,-0.635) 6(-2.625,-1.905) 7(-2.625,-3.175) 8(-2.625,-4.445) 9(2.625,-4.445) 10(2.625,-3.175) 11(2.625,-1.905) 12(2.625,-0.635) 13(2.625,0.635) 14(2.625,1.905) 15(2.625,3.175) 16(2.625,4.445)
  silkscreen extent -2.75,-5 1.6,5.39, body extent -3,-4.95 3,4.95, height 1.59
FP-6_541-5014_01-4-IPC_A [mm]
  rect 1.633x0.572 smd paste+0 mask+0: 1(-1.038,0.95)
  rrect100% 1.633x0.572 smd paste+0 mask+0: 2(-1.038,-0.95) 3(1.038,0)
  silkscreen extent -0.66,-1.47 0.66,1.48, body extent -1.24,-1.48 1.24,1.48, height 1.15
FP-RN73R2A-IPC_A [mm] "0805 (2012 metric)"
  rect 1.025x1.4 smd paste+0 mask+0: 1(-0.913,0) 2(0.912,0)
  silkscreen extent -0.19,-0.85 0.19,0.85
FP-SOT109-1-MFG [mil]
  rect 86.79x23.94 smd paste+0 mask+0: 1(-100.43,175)
  rrect100% 86.79x23.94 smd paste+0 mask+0: 2(-100.43,125) 3(-100.43,75) 4(-100.43,25) 5(-100.43,-25) 6(-100.43,-75) 7(-100.43,-125) 8(-100.43,-175) 9(100.43,-175) 10(100.43,-125) 11(100.43,-75) 12(100.43,-25) 13(100.43,25) 14(100.43,75) 15(100.43,125) 16(100.43,175)
  silkscreen extent -186,-195 37,195, body extent -118,-195 118,195, height 69
HDR_1X3_P2.54 [mm] "Pin header 1x3, 2.54 mm"
  rect 1.7x1.7 hole 1: 1(0,0)
  round 1.7 hole 1: 2(2.54,0) 3(5.08,0)
HDR_1X14_P2.54 [mm] "Single-row header 1x14, 2.54 mm pitch (board-to-board)"
  rect 1.7x1.7 hole 1: 1(-16.51,0.013)
  round 1.7 hole 1: 2(-13.97,0.013) 3(-11.43,0.013) 4(-8.89,0.013) 5(-6.35,0.013) 6(-3.81,0.013) 7(-1.27,0.013) 8(1.27,0.013) 9(3.81,0.013) 10(6.35,0.013) 11(8.89,0.013) 12(11.43,0.013) 13(13.97,0.013) 14(16.51,0.013)
  silkscreen extent -18.38,-1.59 17.78,1.61
HDR_2x20_P2.54 [mm] "Pin header 2x20, 2.54 mm (analog board, top)"
  rect 1.7x1.7 hole 1: 1(-24.13,1.27)
  round 1.7 hole 1: 2(-24.13,-1.27) 3(-21.59,1.27) 4(-21.59,-1.27) 5(-19.05,1.27) 6(-19.05,-1.27) 7(-16.51,1.27) 8(-16.51,-1.27) 9(-13.97,1.27) 10(-13.97,-1.27) 11(-11.43,1.27) 12(-11.43,-1.27) 13(-8.89,1.27) 14(-8.89,-1.27) 15(-6.35,1.27) 16(-6.35,-1.27) 17(-3.81,1.27) 18(-3.81,-1.27) 19(-1.27,1.27) 20(-1.27,-1.27) 21(1.27,1.27) 22(1.27,-1.27) 23(3.81,1.27) 24(3.81,-1.27) 25(6.35,1.27) 26(6.35,-1.27) 27(8.89,1.27) 28(8.89,-1.27) 29(11.43,1.27) 30(11.43,-1.27) 31(13.97,1.27) 32(13.97,-1.27) 33(16.51,1.27) 34(16.51,-1.27) 35(19.05,1.27) 36(19.05,-1.27) 37(21.59,1.27) 38(21.59,-1.27) 39(24.13,1.27) 40(24.13,-1.27)
  silkscreen extent -26,-2.8 25.4,2.8
SOP65P640X120-14N [mm]
  rect 1.475x0.45 smd: 1(-2.938,1.95) 2(-2.938,1.3) 3(-2.938,0.65) 4(-2.938,0) 5(-2.938,-0.65) 6(-2.938,-1.3) 7(-2.938,-1.95) 8(2.938,-1.95) 9(2.938,-1.3) 10(2.938,-0.65) 11(2.938,0) 12(2.938,0.65) 13(2.938,1.3) 14(2.938,1.95)
  silkscreen extent -3.67,-2.5 1.85,2.52
TL072 [mil]
  rect 97.4x23.31 smd paste+0 mask+0: 1(-95.12,75)
  rrect100% 97.4x23.31 smd paste+0 mask+0: 2(-95.12,25) 3(-95.12,-25) 4(-95.12,-75) 5(95.12,-75) 6(95.12,-25) 7(95.12,25) 8(95.12,75)
  silkscreen extent -171,-96 27,96, body extent -118,-96 118,96, height 69
TL074 [mm] "SOIC, 14-Leads, Body 8.75x4mm, Pitch 1.27mm, IPC Low Density"
  rrect15% 1.65x0.65 smd: 1(-2.825,3.81) 2(-2.825,2.54) 3(-2.825,1.27) 4(-2.825,0) 5(-2.825,-1.27) 6(-2.825,-2.54) 7(-2.825,-3.81) 8(2.825,-3.81) 9(2.825,-2.54) 10(2.825,-1.27) 11(2.825,0) 12(2.825,1.27) 13(2.825,2.54) 14(2.825,3.81)
  silkscreen extent -2.95,-4.37 1.6,4.81, body extent -3.02,-4.32 3.02,4.32, height 1.59

## Part data
C30 C31 C32 C33 C34 C35 C36 C44 C45 C46 C47 C48 C49 C50 C51 C52 C53 C54 C55 C56 C57 C58 C59 C60 C67 C68 C69 C70 C71 C72 C73 C74 C75 C76 C77 C78 C79 C80 C81 C87: library part CAP, Manufacturer=Vitramon, Part Number=VJ0805Y682KXAMT
D3 D4 D5 D6 D7 D8 D9 D10: library part 4148WS, "DIODE GEN PURP 75V 150MA SOD323F", Average Rectified Current=150mA, Forward Voltage=1V, Max Forward Surge Current (Ifsm)=2A, Max Operating Temperature=150°C, Max Repetitive Reverse Voltage (Vrrm)=75V, Min Operating Temperature=-55°C, Package Quantity=1, Peak Reverse Current=5uA, Power Dissipation=200mW, Contact Plating=Tin, Element Configuration=Single, Forward Current=150mA, Height=1mm, Lead Free="Lead Free", Length=1.8mm, Max Reverse Voltage (DC)=75V, Mount="Surface Mount", Number of Pins=2, Packaging="Tape and Reel", Radiation Hardening=No, REACH SVHC="No SVHC", Recovery Time=4ns, Reverse Recovery Time=4ns, Reverse Voltage=75V, Weight=0.0276g, Width=1.35mm
D12 D13: library part BAT54S, "DIODE ARRAY SCHOTTKY 30V SOT23", Capacitance=10pF, Forward Current=200mA, Manufacturer=Vishay, Max Junction Temp=+125°C, Max Repetitive Reverse Voltage=30V, Max Surge Forward Current=600mA, Package=6.541-5014.01-4, Peak Reverse Current=2uA, Temperature="-55°C to +125°C", Temperature Range Low=-55°C, Automotive=No, Category=Diode, ComponentLink2Description=Datasheet, ComponentLink2URL=http://www.vishay.com/docs/85508/bat54.pdf, Device Class L1="Discrete Semiconductors", Device Class L2=Diodes, Device Class L3="Schottky Diodes", Digikey Description="DIODE ARRAY SCHOTTKY 30V SOT23", Height=1.15mm, Lead Free=Yes, Manufacturer Part Number=BAT54S-E3-08, Mouser Description="Schottky Diodes & Rectifiers 200mA 30 Volt", Octopart=https://octopart.com/bat54s-e3-08-vishay-29186616, RoHS=TRUE, Temperature Range High=+125°C
IC5 IC8 IC9: library part tl074, "Quad Low-Noise JFET-Input General-Purpose Operational Amplifier, 7 to 36 V, 0 to 70 degC, 14-pin SOIC (D14), Green (RoHS & no Sb/Br)", Manufacturer="Texas Instruments", Rating=Military, Total Supply Voltage(Max)(+5V is 5, +/-5V is 10)=36, Total Supply Voltage(Min)(+5V is 5, +/-5V is 10)=7, CMRR(Min)(dB)=70, Code_JEDEC=MS-012, ComponentLink1Description="Manufacturer URL", ComponentLink1URL=http://www.ti.com/, ComponentLink2Description=Datasheet, ComponentLink2URL=http://www.ti.com/lit/ds/symlink/tl074.pdf, ComponentLink3Description="Package Specification", ComponentLink3URL=http://www.ti.com/lit/ml/mpds177g/mpds177g.pdf, DatasheetVersion=SLOS080J, Eco-Plan="Green (RoHS & no Sb/Br)", GBW(Typ)(MHz)=3, IIB(Max)(pA)=200, Iq per channel(Max)(mA)=2.5, Mounting Technology="Surface Mount", Number of Channels=4, Offset Drift(Typ)(uV/C)=18, PackageDescription="14-Pin Plastic Small Outline, Body 8.65 x 3.90 mm, Pitch 1.27 mm", PackageReference=D0014A, PackageVersion="4040047-5/M, 06/2011", PartNumber=TL074CDRG4, Slew Rate(Typ)(V/us)=13, Sub Family="General Purpose Amplifier, High Supply Voltage Amplifier (>=30V)", Vio (25C)(Max)(mV)=10, Vn at 1kHz(Typ)(nV/rtHz)=18
IC6 IC13 IC17: library part 74HC165, "IC SHIFT REGST 8BIT PI-SO 16SOIC", Ambient Temperature Range High=+125°C, Ambient Temperature Range Low=-40°C, Frequency=61MHz, Manufacturer=Nexperia, Max Supply Voltage=6V, Min Supply Voltage=2V, Nominal Supply Current=8uA, Package=SOT109-1, Temperature="-40°C to +125°C", Automotive=No, Category=IC, ComponentLink2Description=Datasheet, ComponentLink2URL=https://assets.nexperia.com/documents/data-sheet/74HC_HCT165.pdf, Device Class L1="Integrated Circuits (ICs)", Device Class L2="Logic ICs", Device Class L3="Shift Registers", Digikey Description="IC SHIFT REGST 8BIT PI-SO 16SOIC", Footprint Url=https://assets.nexperia.com/documents/outline-drawing/SOT109-1.pdf, Height=1.75mm, Ipc Land Pattern Name=SOP127P600X175-16, Lead Free=Yes, Logic Function Desc="Shift Register", Manufacturer Part Number=74HC165D,653, Number Of Circuits=1, Number Of Inputs=8, Number Of Outputs=1, Octopart=https://octopart.com/74hc165d%2C653-nexperia-78737091, Propagation Delay=15ns, RoHS=TRUE, Standoff Height=0.1mm, Temperature Range High=+125°C, Temperature Range Low=-40°C
IC12: library part TLC5916, "Automotive Catalog 8-Bit Constant-Current LED Sink Drivers, 3 to 5.5 V, -40 to 125 degC, 16-pin SOIC (D16), Green (RoHS & no Sb/Br)", Manufacturer="Texas Instruments", Code_JEDEC=MS-012, ComponentLink1Description="Manufacturer URL", ComponentLink1URL=http://www.ti.com/, ComponentLink2Description=Datasheet, ComponentLink2URL=http://www.ti.com/general/docs/lit/getliterature.tsp?genericPartNumber=TLC5916-Q1&fileType=pdf, ComponentLink3Description="Package Specification", ComponentLink3URL=http://www.ti.com/litv/pdf/mpds178g, DatasheetVersion=SLVS814, Eco-Plan="Green (RoHS & no Sb/Br)", Iout(Max)(A)=0.12, Mounting Technology="Surface Mount", PackageDescription="16-Pin Plastic Small Outline, Body 9.90 x 3.90 mm, Pitch 1.27 mm", PackageReference=D0016A, PackageVersion=4040047-6/M, PartNumber=TLC5916QDRQ1, SubFamily="LED Driver", Vin(Max)(V)=5.5, Vin(Min)(V)=3
IC15: "99dB SNR Stereo ADC With Single-Ended Inputs", Manufacturer_Name="Texas Instruments", Mouser Part Number=595-PCM1808PW, Datasheet Link=http://www.ti.com/lit/gpn/pcm1808, Geometry.Height=1.2mm, Manufacturer_Part_Number=PCM1808PW, Mouser Price/Stock=https://www.mouser.co.uk/ProductDetail/Texas-Instruments/PCM1808PW?qs=iSMark9AYDWYQaMpH%2FhwPg%3D%3D
IC16: library part tl072, "Low-Noise JFET-Input Operational Amplifier, 7 to 36 V, 0 to 70 degC, 8-pin SOIC (D8), Green (RoHS & no Sb/Br)", Manufacturer="Texas Instruments", Rating=Catalog, Total Supply Voltage(Max)(+5V is 5, +/-5V is 10)=36, Total Supply Voltage(Min)(+5V is 5, +/-5V is 10)=7, CMRR(Min)(dB)=75, Code_JEDEC=MS-012, ComponentLink1Description="Manufacturer URL", ComponentLink1URL=http://www.ti.com/, ComponentLink2Description=Datasheet, ComponentLink2URL=http://www.ti.com/lit/ds/symlink/tl072a.pdf, ComponentLink3Description="Package Specification", ComponentLink3URL=http://www.ti.com/litv/pdf/msoi002j, DatasheetVersion=SLOS080J, Eco-Plan="Green (RoHS & no Sb/Br)", GBW(Typ)(MHz)=3, IIB(Max)(pA)=200, Iq per channel(Max)(mA)=2.5, Mounting Technology="Surface Mount", Number of Channels=2, Offset Drift(Typ)(uV/C)=18, PackageDescription="8-Pin Plastic Small Outline, Body 4.9 x 3.9 mm, Pitch 1.27 mm", PackageReference=D8, PackageVersion="4040047-3/M, 06/2011", PartNumber=TL072ACDRE4, Slew Rate(Typ)(V/us)=13, Sub Family="General Purpose Amplifier, High Supply Voltage Amplifier (>=30V)", Vio (25C)(Max)(mV)=6, Vn at 1kHz(Typ)(nV/rtHz)=18
Q1 Q2 Q3 Q4 Q5 Q6 Q7 Q8: library part 3904, "TRANS NPN 40V 0.2A SMD SOT23-3", Case/Package=SOT-23, Collector Base Voltage (VCBO)=60V, Collector Emitter Breakdown Voltage=40V, Collector Emitter Saturation Voltage=300mV, Continuous Collector Current=200mA, Emitter Base Voltage (VEBO)=6V, Frequency=300MHz, Max Operating Temperature=150°C, Max Power Dissipation=300mW, Min Operating Temperature=-55°C, Package Quantity=3000, Power Dissipation=350mW, Collector Emitter Voltage (VCEO)=40V, Contact Plating=Tin, Element Configuration=Single, Gain Bandwidth Product=300MHz, Height=1mm, hFE Min=100, Lead Free="Lead Free", Length=3.05mm, Max Breakdown Voltage=40V, Max Collector Current=200mA, Max Frequency=300MHz, Mount="Surface Mount", Number of Elements=1, Number of Pins=3, Packaging="Tape and Reel", Polarity=NPN, Radiation Hardening=No, REACH SVHC="No SVHC", Transition Frequency=300MHz, Voltage Rating (DC)=40V, Weight=0.000282oz, Width=1.4mm
R1 R20 R21 R22 R23 R24 R25 R26 R27 R28 R29 R30 R31 R32 R33 R34 R35 R36 R37 R38 R39 R40 R41 R42 R43 R44 R45 R46 R47 R48 R49 R50 R51 R52 R53 R54 R55 R56 R57 R58 R59 R60 R61 R62 R63 R64 R65 R66 R67 R68 R69 R70 R71 R72 R73 R74 R75 R80 R81 R82 R83 R84 R85 R86 R87 R88 R96 R97 R102 R103 R108 R109 R114 R115 R123 R124 R125 R126 R127 R128 R129 R130 R131 R132 R133 R134 R135 R136 R137 R138 R139: library part Resistor, "RES 10K OHM 0.1% 1/8W 0805"

## Via types
v1: diameter 0.6, hole 0.3, Top Layer to Bottom Layer, 342 vias
v2: diameter 0.8, hole 0.4, Top Layer to Bottom Layer, 2 vias

## Nets (pads, with @x,y where several pads share a name; then routed paths per layer and width w, separated by ;. In a path a pad name is that pad's centre, name@x,y a point inside that pad or via, vN(x,y) a via of type N, cw(c..) or ccw(c..) an arc to the next point about the centre after c; other vN are vias at no path point)
+3.3: C34.1 C60.1 C73.2 C87.1 H1.39 IC6.16 IC12.16 IC13.16 IC15.4 IC17.16 R1.2 R32.1 R33.1 R34.1 R35.1 R36.1 R37.1 R38.1 R40.1 R81.1 R82.1 R83.1 R84.1 R85.1 R86.1 R87.1 R88.1 R132.1 R133.1 R134.1 R135.1 R136.1 R137.1 R138.1 R139.1 | length 273.5
  PWR w0.254: v1@87.274,60.698 v1(87.274,60.782)
  PWR w0.5: v1(32.588,25.544) 32.561,25.544 32.372,25.355 23.947,25.355 v1(18.796,30.505) 18.796,13.691 17.215,12.11 6.464,12.11 5.994,12.579 5.994,60.164 H1.39@7.5,61.67 7.5,61.995 7.928,62.423 7.928,62.504 8.674,63.25 34.327,63.25 40.555,57.023 57.328,57.023 v1(57.683,56.667) ; v1(58.268,51.613) 59.766,53.111 v1(60.249,53.111) 66.675,46.685 v1(68.199,46.685) 72.619,46.685 v1(76.784,50.851) 86.462,50.851 ; v1@87.274,60.698 86.835,60.259 86.835,51.224 86.462,50.851 ; v2(103.126,58.649) 100.432,55.955 v2(100.432,49.124) 99.162,47.854 v1(87.478,47.854) 87.478,49.835 86.462,50.851
  Bottom Layer w0.254: R36.1@19.726,27.591 19.726,29.576 v1(18.796,30.505) 19.726,31.435 R40.1@19.726,33.82 ; IC6.16@29.721,25.062 32.208,25.062 32.495,25.349 v1@32.588,25.349 ; v1(32.588,25.544) v1@32.588,25.349 ; R32.1@35.922,33.571 R33.1@35.922,31.497 R34.1@35.922,29.186 R35.1@35.922,27.112 35.922,26.924 35.536,26.539 35.41,26.539 34.097,25.225 C34.1@34.097,25.038 33.785,25.349 v1@32.588,25.349 ; v1(57.683,56.667) 57.683,52.197 v1(58.268,51.613) ; IC12.16@59.911,51.698 59.911,52.704 60.249,53.042 v1(60.249,53.111) ; v1(68.199,46.685) 68.293,46.685 68.456,46.849 69.558,46.849 C73.2@69.944,47.235 ; IC15.4@76.65,49.277 76.748,49.375 76.748,50.15 76.784,50.186 v1(76.784,50.851) ; R1.2@87.168,49.794 R1.2@87.214,49.84 ; R139.1@87.214,58.257 87.214,60.721 v1(87.274,60.782) ; v1@87.478,47.76 v1(87.478,47.854) ; C87.1@96.545,48.041 C87.1@96.545,48.228 ; IC17.16@96.545,50.146 96.708,50.31 IC17.16@97.209,50.31 ; R135.1@101.503,52.005 R135.1@101.503,52.193
  Bottom Layer w0.5: R85.1@87.214,39.186 R87.1@87.214,43.398 R88.1@87.214,45.479 87.214,47.496 v1@87.478,47.76 ; R1.2@87.214,49.84 R138.1@87.214,56.177 R139.1@87.214,58.257
+5: H1.35 R123.2 | length 76.5
  PWR w0.254: H1.35@7.5,56.59 8.677,55.413 16.909,55.413 17.706,56.21 57.254,56.21 57.424,56.04 57.943,56.04 58.113,56.21 v1(71.526,56.21)
  Bottom Layer w0.254: v1(71.526,56.21) 71.526,56.117 71.161,55.751 71.161,46.249 72,45.41 R123.2@72.188,45.41
+12: C30.2 C44.1 C45.1 C48.1 C49.1 C58.2 C74.1 C75.1 D12.2 D13.2 H1.1 H2.1 IC5.4 IC8.4 IC9.4 IC16.8 | length 201.6
  PWR w0.254: H1.1@7.5,13.41 8.863,14.773 10.528,14.773 15.273,19.519 15.273,21.417 17.196,23.339 v1(17.196,51.994) ; v1(17.362,53.934) 17.369,53.934 17.847,54.412 26.855,54.412 26.918,54.475 27.438,54.475 27.501,54.412 40.391,54.412 v1(41.351,55.372) 44.479,52.244 v1(55.448,52.244) ; v1(54.254,48.26) 53.178,47.183 53.178,44.971 52.84,44.634 52.84,44.114 53.178,43.776 53.178,40.255 53.891,39.542 53.891,33.284 61.516,25.659 62.327,25.659 v1(65.888,22.098) ; H2.1@108.73,13.64 H2.1@108.96,13.41
  PWR w0.5: v1(65.888,22.098) 65.915,22.098 66.067,21.946 v1(94.132,21.946) 94.132,20.498 98.265,16.366 98.265,15.102 99.727,13.64 H2.1@108.73,13.64
  Bottom Layer w0.254: C58.2@15.9,52.118 15.9,52.305 17.145,53.551 17.613,53.551 ; C30.2@15.9,54.192 15.9,54.004 16.285,53.619 17.145,53.619 17.145,53.623 17.362,53.84 v1(17.362,53.934) ; v1(17.196,51.994) 17.196,53.133 17.613,53.551 ; IC5.4@19.195,53.688 19.159,53.652 17.715,53.652 17.613,53.551 ; C75.1@40.136,56.115 40.136,55.928 40.522,55.542 40.709,55.542 40.813,55.438 41.285,55.438 v1(41.351,55.372) 41.285,55.306 41.285,55.191 41.024,54.93 40.838,54.93 40.136,54.229 C74.1@40.136,54.041 40.208,53.97 IC16.8@40.208,51.732 ; D13.2@53.661,50.017 D13.2@54.041,50.017 ; D12.2@53.661,54.361 54.277,54.361 54.436,54.202 54.46,54.202 55.448,53.213 v1(55.448,52.244) 55.448,51.275 54.191,50.017 D13.2@54.041,50.017 ; v1(54.254,48.26) 54.188,48.326 54.188,49.87 D13.2@54.041,50.017 ; C44.1@64.512,23.061 C44.1@64.512,22.873 ; v1(65.888,22.098) 65.794,22.098 65.429,22.463 65.11,22.463 65.085,22.488 64.897,22.488 C44.1@64.512,22.873 ; IC8.4@68.725,21.994 68.225,21.994 67.756,21.525 64.868,21.525 64.868,21.412 64.482,21.027 64.482,20.987 64.512,21.017 C44.1@64.512,22.873 ; IC9.4@92.586,21.534 92.751,21.699 93.792,21.699 94.039,21.946 v1(94.132,21.946) 94.199,22.012 94.616,22.012 95.452,22.848 C48.1@95.452,23.036 95.378,22.961 C49.1@95.378,20.962 v1(96.19,20.962)
-12: C31.2 C46.1 C47.1 C50.1 C51.1 C59.2 C76.1 C77.1 D12.1 D13.1 H1.3 H2.3 IC5.11 IC8.11 IC9.11 IC16.4 | length 197.8
  PWR w0.254: H1.3@7.5,15.95 8.677,17.127 10.342,17.127 12.7,19.485 12.7,48.385 18.163,53.848 39.304,53.848 v1(46.533,46.619) 49.692,46.619 v1(54.153,51.079) 57.914,51.079 58.238,50.756 58.578,50.756 63.813,45.521 63.813,36.088 71.958,27.943 71.958,27.104 75.966,23.097 76.894,23.097 v1(78.054,24.257) 83.312,24.257 v1(83.363,24.206) 94.182,24.206 98.536,19.853 109.262,19.853 110.137,18.978 110.137,17.127 H2.3@108.96,15.95
  Bottom Layer w0.254: IC5.11@24.845,53.688 24.939,53.782 27.112,53.782 v1(27.178,53.848) 28.872,53.848 C31.2@29.075,54.051 C59.2@31.149,54.051 ; IC16.4@45.04,47.922 44.266,47.922 44.11,47.766 C77.1@44.11,45.457 C76.1@46.184,45.457 46.533,45.806 v1(46.533,46.619) ; D12.1@53.661,56.261 53.13,56.261 52.971,56.102 52.971,55.122 52.517,54.668 52.517,53.688 52.971,53.234 52.971,52.077 53.13,51.917 D13.1@53.661,51.917 53.994,51.917 54.153,51.758 v1(54.153,51.079) ; IC8.11@74.375,21.994 74.875,21.994 75.806,21.063 C46.1@77.625,21.063 C47.1@77.625,23.137 78.01,23.523 78.01,24.213 v1(78.054,24.257) ; v1(83.363,24.206) 83.429,24.14 83.429,24.016 84.171,23.274 C50.1@84.171,23.086 84.171,21.074 C51.1@84.11,21.012 85.915,21.012 86.436,21.534 IC9.11@86.936,21.534
ADC_INL: C72.1 D12.3 R127.2 | length 6.3
  Bottom Layer w0.254: R127.2@46.093,56.457 46.345,56.709 C72.1@48.964,56.709 49.151,56.709 49.962,55.898 49.962,55.736 50.386,55.311 D12.3@51.584,55.311
ADC_INR: C69.1 D13.3 R131.2 | length 7
  Bottom Layer w0.254: R131.2@46.093,54.041 46.479,53.656 46.479,53.291 48.649,51.121 C69.1@48.837,51.121 48.99,50.967 D13.3@51.584,50.967
D0: IC6.11 Q1.3 R32.2 | length 15
  Top Layer w0.254: v1(33.054,32.529) 33.096,32.487 33.117,32.508 41.051,32.508 v1(41.072,32.487)
  Bottom Layer w0.254: IC6.11@29.721,31.412 31.938,31.412 v1@33.029,32.503 ; v1(33.054,32.529) v1@33.029,32.503 ; R32.2@34.097,33.571 34.097,33.384 33.711,32.998 33.524,32.998 v1@33.029,32.503 ; v1(41.072,32.487) 41.088,32.47 42.611,32.47 Q1.3@42.627,32.454
D0_L: H1.20 IC13.11 R81.2 | length 95.9
  Top Layer w0.254: H1.20@10.04,36.27 33.468,36.27 33.949,35.789 48.33,35.789 48.625,35.493 58.367,35.493 58.821,35.947 59.724,35.947 59.884,36.107 59.884,37.459 60.277,37.852 74.428,37.852 77.538,40.962 94.256,40.962 94.693,40.525 v1(94.782,40.525)
  Bottom Layer w0.254: v1(94.782,40.525) 94.782,40.56 95.388,41.166 95.388,41.794 96.411,42.817 IC13.11@97.209,42.817 98.007,42.817 98.684,43.493 98.684,43.948 99.678,44.942 R81.2@99.678,45.13
D0_M: H2.37 IC17.11 R132.2 | length 15.1
  Top Layer w0.254: v1(99.492,60.096) 99.847,60.452 107.638,60.452 H2.37@108.96,59.13
  Bottom Layer w0.254: IC17.11@97.209,56.66 97.912,56.66 98.075,56.823 98.075,57.079 99.678,58.681 R132.2@99.678,58.869 99.492,59.055 v1(99.492,60.096)
D1: IC6.12 Q3.3 R33.2 | length 16.8
  Top Layer w0.254: v1(32.742,30.142) v1(39.86,30.142)
  Bottom Layer w0.254: IC6.12@29.721,30.142 v1(32.742,30.142) 33.524,30.924 33.711,30.924 34.097,31.31 R33.2@34.097,31.497 ; v1(39.86,30.142) 39.86,29.133 42.035,26.959 Q3.3@42.627,26.959
D1_L: H1.19 IC13.12 R82.2 | length 99.3
  Top Layer w0.254: H1.19@7.5,36.27 8.863,34.907 28.165,34.907 28.191,34.881 47.492,34.881 47.788,34.585 57.015,34.585 57.815,33.785 61.819,33.785 63.342,35.308 63.342,35.95 63.882,36.49 78.922,36.49 78.983,36.551 v1(94.183,36.551)
  Bottom Layer w0.254: v1(94.183,36.551) 94.183,38.108 94.445,38.369 94.445,39.585 94.757,39.898 95.041,39.898 95.409,40.265 95.409,40.544 96.411,41.547 IC13.12@97.209,41.547 98.007,41.547 98.886,42.426 99.292,42.426 99.678,42.811 R82.2@99.678,42.999
D1_M: H2.36 IC17.12 R133.2 | length 18.1
  Top Layer w0.254: v1(99.466,56.439) 107.638,56.439 107.712,56.513 ccw(c107.533,56.693) 107.713,56.514 107.829,56.916 cw(c108.96,56.59) 110.137,56.584 110.208,56.513 110.282,56.439 111.349,56.439 H2.36@111.5,56.59
  Bottom Layer w0.254: IC17.12@97.209,55.39 98.007,55.39 98.99,56.373 99.4,56.373 v1(99.466,56.439) 99.56,56.439 99.865,56.744 R133.2@101.196,56.744
D2: IC6.13 Q5.3 R34.2 | length 21.2
  Top Layer w0.254: v1(32.029,29.186) 37.436,29.186 37.562,29.312 v1(39.04,29.312)
  Bottom Layer w0.254: IC6.13@29.721,28.872 30.615,28.872 30.929,29.186 v1(32.029,29.186) R34.2@34.097,29.186 ; v1(39.04,29.312) 41.326,27.026 41.326,22.25 42.112,21.464 Q5.3@42.627,21.464
D2_L: H1.18 IC13.13 R83.2 | length 96.1
  Top Layer w0.254: H1.18@10.04,33.73 28.133,33.73 28.798,34.395 47.336,34.395 47.6,34.131 56.827,34.131 57.627,33.331 62.007,33.331 63.72,35.044 94.877,35.044 v1(94.945,34.976)
  Bottom Layer w0.254: v1(94.945,34.976) 94.945,39.16 95.275,39.489 95.623,39.489 96.411,40.277 99.23,40.277 99.678,40.724 R83.2@99.678,40.912
D2_M: IC17.13 R134.2 | length 2.6
  Bottom Layer w0.254: IC17.13@97.209,54.12 98.103,54.12 98.441,54.458 R134.2@99.678,54.458
D3: IC6.14 Q7.3 R35.2 | length 24.7
  Top Layer w0.254: v1(32.182,27.356) 32.207,27.381 32.22,27.368 39.129,27.368 v1(39.141,27.381)
  Bottom Layer w0.254: IC6.14@29.721,27.602 v1@32.182,27.602 ; v1(32.182,27.356) v1@32.182,27.602 ; R35.2@34.097,27.112 34.097,27.217 33.711,27.602 v1@32.182,27.602 ; v1(39.141,27.381) 39.141,22.123 42.627,18.637 Q7.3@42.627,15.969
D3_L: H2.25 IC13.14 R84.2 | length 19.5
  Top Layer w0.254: v1(95.69,38.818) 95.734,38.862 103.932,38.862 H2.25@108.96,43.89
  Bottom Layer w0.254: v1(95.69,38.818) 95.783,38.818 95.904,38.939 98.171,38.939 98.273,38.837 R84.2@99.678,38.837
D3_M: IC17.14 R135.2 | length 2.9
  Bottom Layer w0.254: IC17.14@97.209,52.85 99.208,52.85 99.678,52.38 R135.2@99.678,52.193
D4: IC6.3 Q2.3 R36.2 | length 16.4
  Top Layer w0.254: v1(20.295,23.317) 20.327,23.35 24.682,23.35 v1(24.714,23.382)
  Bottom Layer w0.254: v1(20.295,23.317) 20.295,22.102 20.542,21.855 Q2.3@20.542,20.183 ; IC6.3@24.62,27.602 21.562,27.602 R36.2@21.551,27.591 21.551,26.3 22.958,24.893 22.958,24.855 24.364,23.449 24.648,23.449 v1(24.714,23.382)
D4_L: H2.26 IC13.3 R85.2 | length 27.3
  Top Layer w0.254: v1(90.094,39.04) 90.899,38.235 95.386,38.235 95.43,38.191 95.949,38.191 95.993,38.235 103.947,38.235 108.239,42.527 110.137,42.527 H2.26@111.5,43.89
  Bottom Layer w0.254: R85.2@89.039,39.186 89.185,39.04 v1(90.094,39.04) 90.11,39.023 92.091,39.023 IC13.3@92.107,39.007
D4_M: IC17.3 R136.2 | length 3.5
  Bottom Layer w0.254: R136.2@88.984,51.868 90.327,51.868 91.309,52.85 IC17.3@92.107,52.85
D5: IC6.4 Q4.3 R37.2 | length 15.7
  Bottom Layer w0.254: IC6.4@24.62,28.872 22.327,28.872 22.106,29.092 21.919,29.092 21.533,29.478 R37.2@21.533,29.665 20.625,28.757 20.625,26.584 21.404,25.804 21.404,25.547 26.253,20.699 Q4.3@26.253,20.183
D5_L: H2.27 IC13.4 R86.2 | length 25.5
  Top Layer w0.254: v1(90.043,40.335) 90.131,40.335 90.569,39.898 96.501,39.898 96.827,40.224 102.754,40.224 H2.27@108.96,46.43
  Bottom Layer w0.254: R86.2@88.984,41.324 88.984,41.137 89.72,40.401 89.977,40.401 v1(90.043,40.335) 90.072,40.306 92.078,40.306 IC13.4@92.107,40.277
D5_M: IC17.4 R137.2 | length 3.2
  Bottom Layer w0.254: R137.2@89.019,53.942 91.035,53.942 91.213,54.12 IC17.4@92.107,54.12
D6: IC6.5 Q6.3 R38.2 | length 18.1
  Bottom Layer w0.254: R38.2@21.533,31.739 22.427,31.739 23.754,30.413 23.754,30.306 23.917,30.142 IC6.5@24.62,30.142 25.418,30.142 26.343,29.217 26.465,29.217 27.384,28.298 27.384,23.691 29.245,21.83 29.887,21.83 31.145,20.572 31.791,20.572 31.963,20.4 Q6.3@31.963,20.183
D6_L: H2.28 IC13.5 R87.2 | length 26.5
  Top Layer w0.254: v1(93.853,42.012) 102.644,42.012 108.239,47.607 110.323,47.607 H2.28@111.5,46.43
  Bottom Layer w0.254: R87.2@89.039,43.398 89.932,43.398 90.587,42.744 90.587,42.269 91.309,41.547 IC13.5@92.107,41.547 93.001,41.547 93.4,41.945 93.787,41.945 v1(93.853,42.012)
D6_M: IC17.5 R138.2 | length 3.5
  Bottom Layer w0.254: R138.2@89.039,56.177 89.039,55.989 89.638,55.39 IC17.5@92.107,55.39
D7: IC6.6 Q8.3 R40.2 | length 25.2
  Bottom Layer w0.254: R40.2@21.551,33.82 21.551,33.633 23.771,31.412 IC6.6@24.62,31.412 25.418,31.412 27.838,28.992 27.838,23.879 29.433,22.284 36.09,22.284 37.674,20.699 Q8.3@37.674,20.183
D7_L: H2.29 IC13.6 R88.2 | length 26.1
  Top Layer w0.254: v1(89.56,46.736) 106.726,46.736 H2.29@108.96,48.97
  Bottom Layer w0.254: v1(89.56,46.736) 89.56,46.642 89.424,46.506 89.424,45.864 R88.2@89.039,45.479 89.039,45.291 91.241,43.088 91.241,42.98 91.405,42.817 IC13.6@92.107,42.817
D7_M: IC17.6 R139.2 | length 3.8
  Bottom Layer w0.254: R139.2@89.039,58.257 89.039,58.069 90.448,56.66 IC17.6@92.107,56.66
GATE_J2: H1.15 R28.1 | length 5.3
  Bottom Layer w0.254: H1.15@7.5,31.19 8.677,32.367 10.575,32.367 10.811,32.131 12.168,32.131 R28.1@12.219,32.08
GATE_J3: H1.16 R29.1 | length 7.5
  Bottom Layer w0.254: H1.16@10.04,31.19 10.317,30.913 10.814,30.913 13.206,28.522 13.206,26.639 12.367,25.8 R29.1@12.367,25.612
GATE_J4: H1.17 R39.1 | length 11.5
  Bottom Layer w0.254: H1.17@7.5,33.73 6.323,32.553 6.323,30.702 7.012,30.013 7.988,30.013 8.665,30.69 8.875,30.69 9.645,29.92 10.435,29.92 11.217,29.138 11.217,29.023 12.367,27.874 R39.1@12.367,27.686
GATE_J5: H2.22 R41.1 | length 7.7
  Bottom Layer w0.254: R41.1@106.596,43.477 106.596,43.29 107.739,42.146 107.739,40.906 108.497,40.148 110.162,40.148 H2.22@111.5,38.81
GATE_J6: H2.21 R44.1 | length 3.5
  Bottom Layer w0.254: R44.1@106.596,41.196 106.596,41.008 108.794,38.81 H2.21@108.96,38.81
GATE_J7: H2.20 R45.1 | length 6.1
  Bottom Layer w0.254: R45.1@106.596,38.914 106.596,38.727 107.876,37.447 110.323,37.447 H2.20@111.5,36.27
GATE_J8: H2.19 R48.1 | length 2.5
  Bottom Layer w0.254: R48.1@106.596,36.632 106.959,36.27 H2.19@108.96,36.27
GATE_J9: H2.18 R49.1 | length 5.6
  Bottom Layer w0.254: R49.1@106.594,34.351 107.916,34.351 108.472,34.907 110.323,34.907 H2.18@111.5,33.73